# Altium PCB BUCK-BOOST_PWM_Controller.PcbDoc (part 1 of 2)
Units mm, origin at the board's own origin, x right, y up, seen from the top; angles counter-clockwise.
Board outline 90.1 x 70.25 mm, 2 copper layers (Top Layer, Bottom Layer); 191 components, 99 nets, 467 pads, 92 vias.
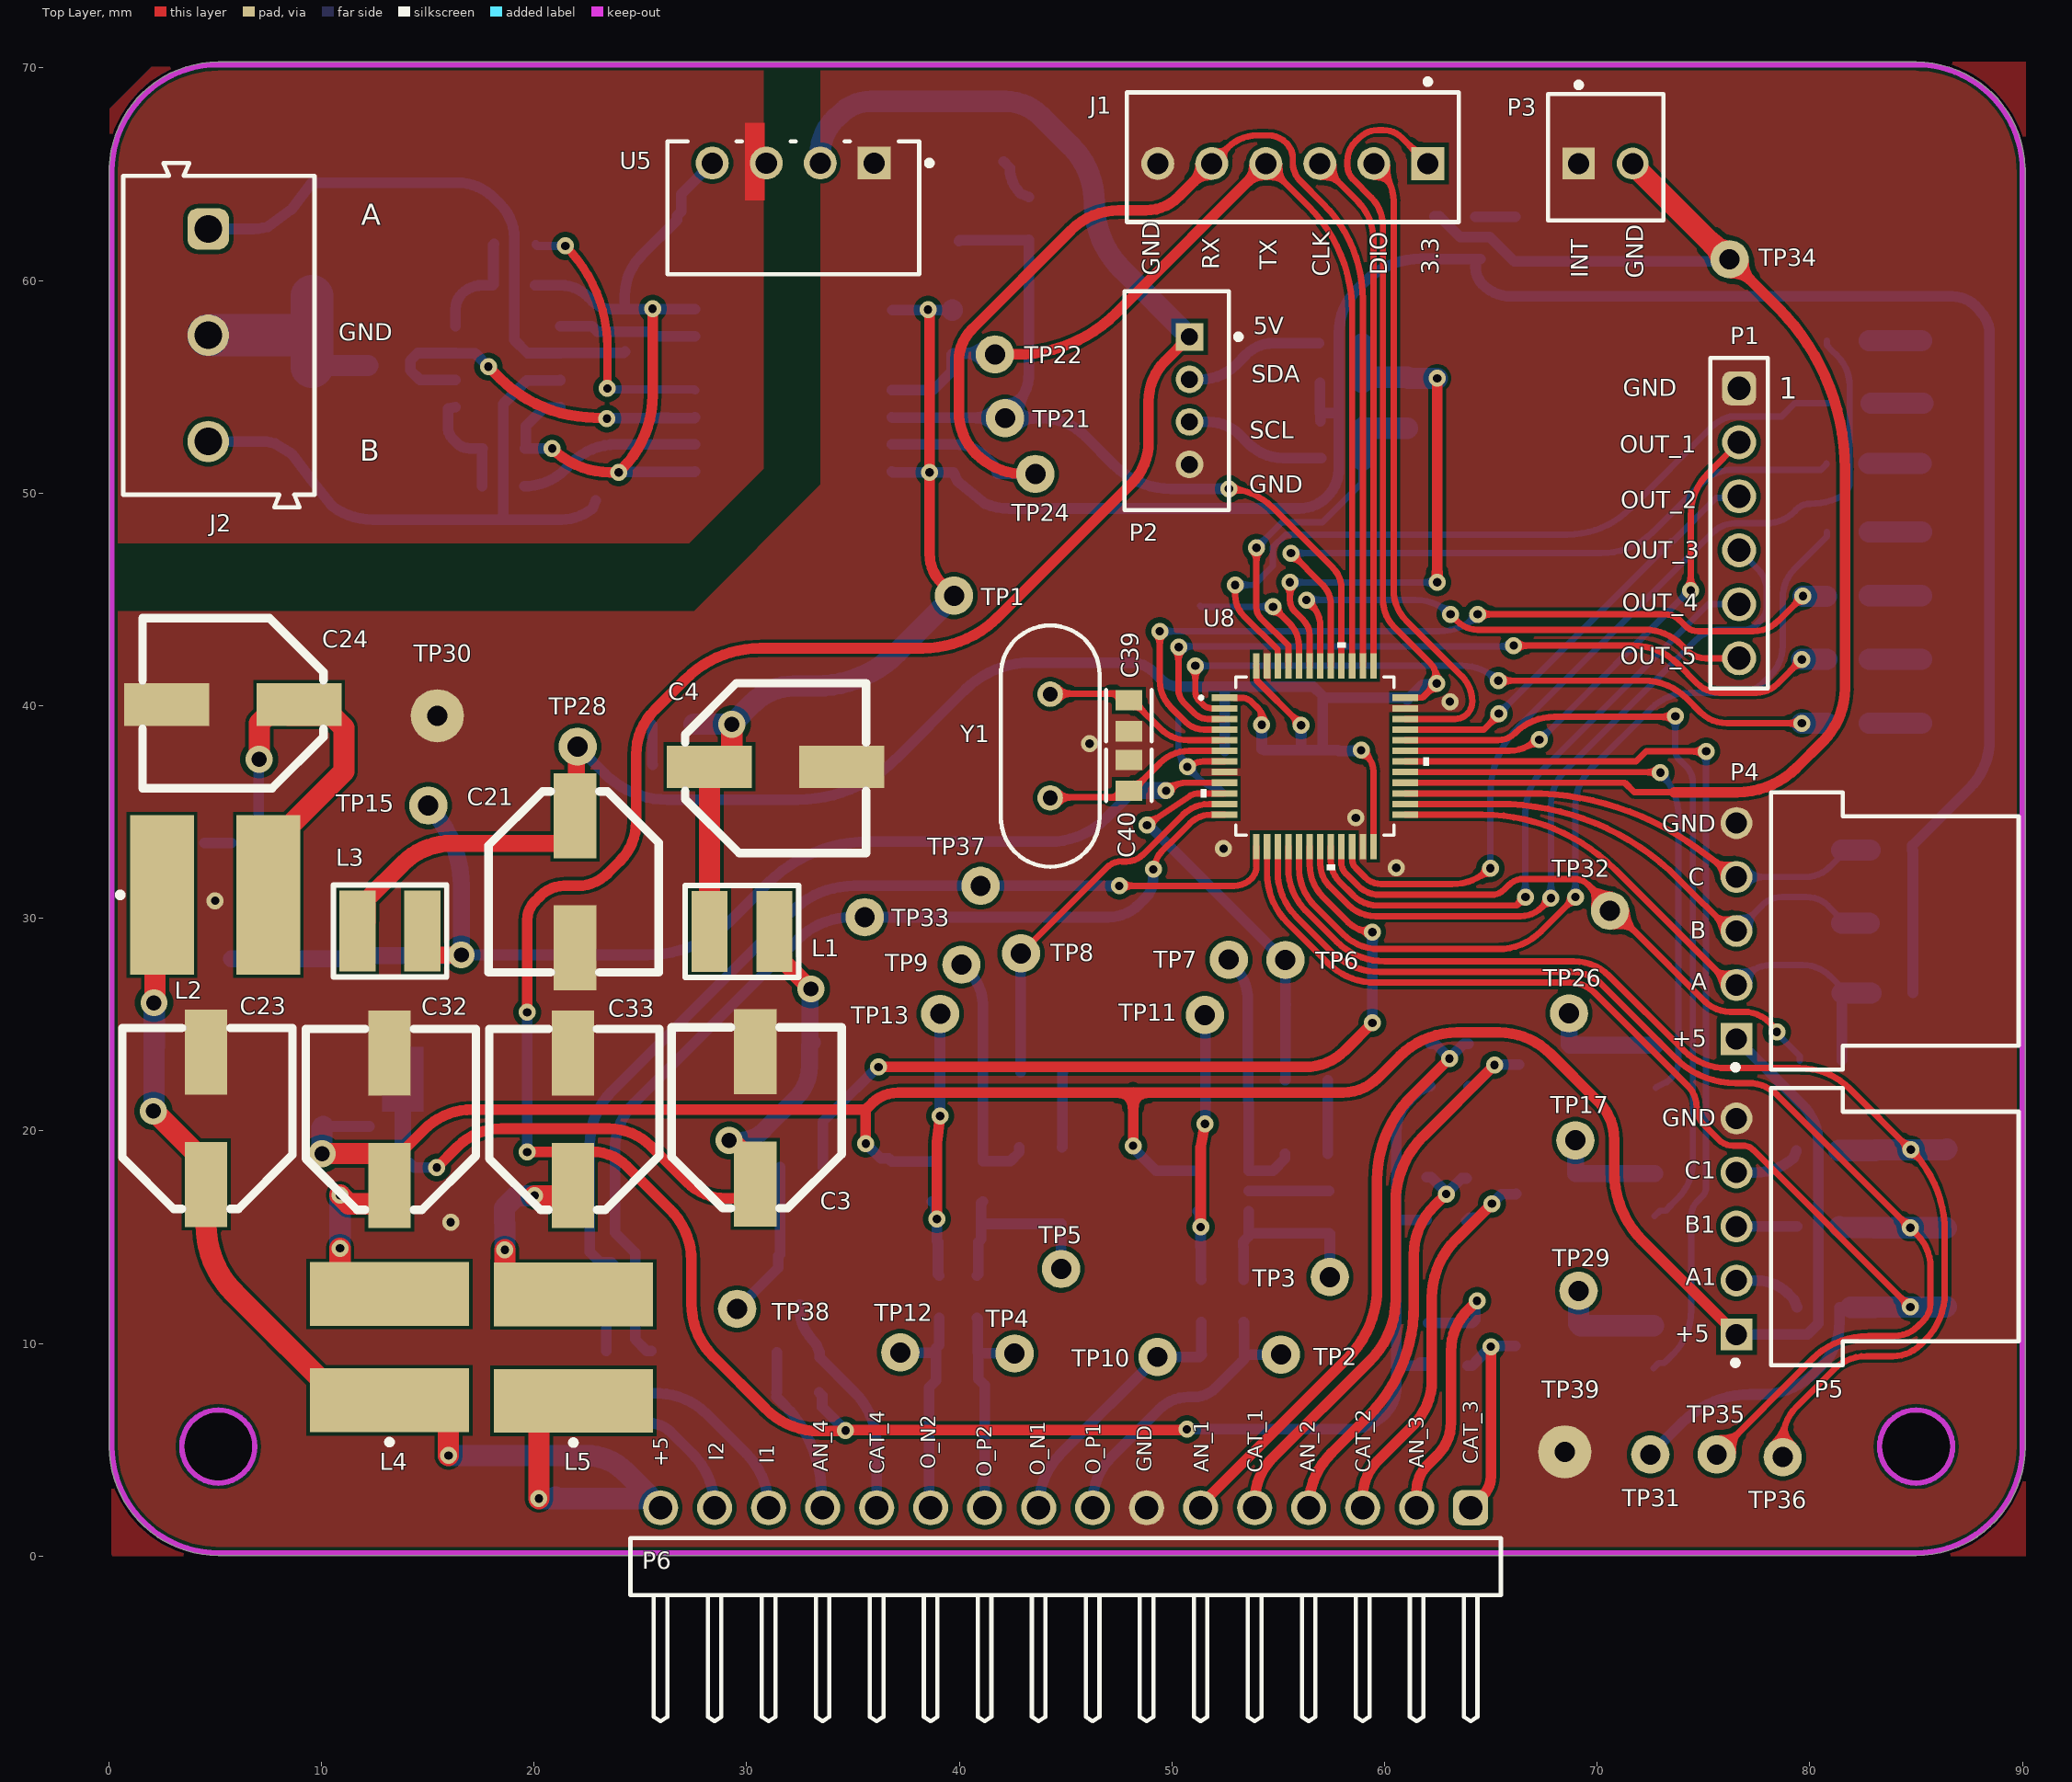
[diagram p0: Top Layer view]
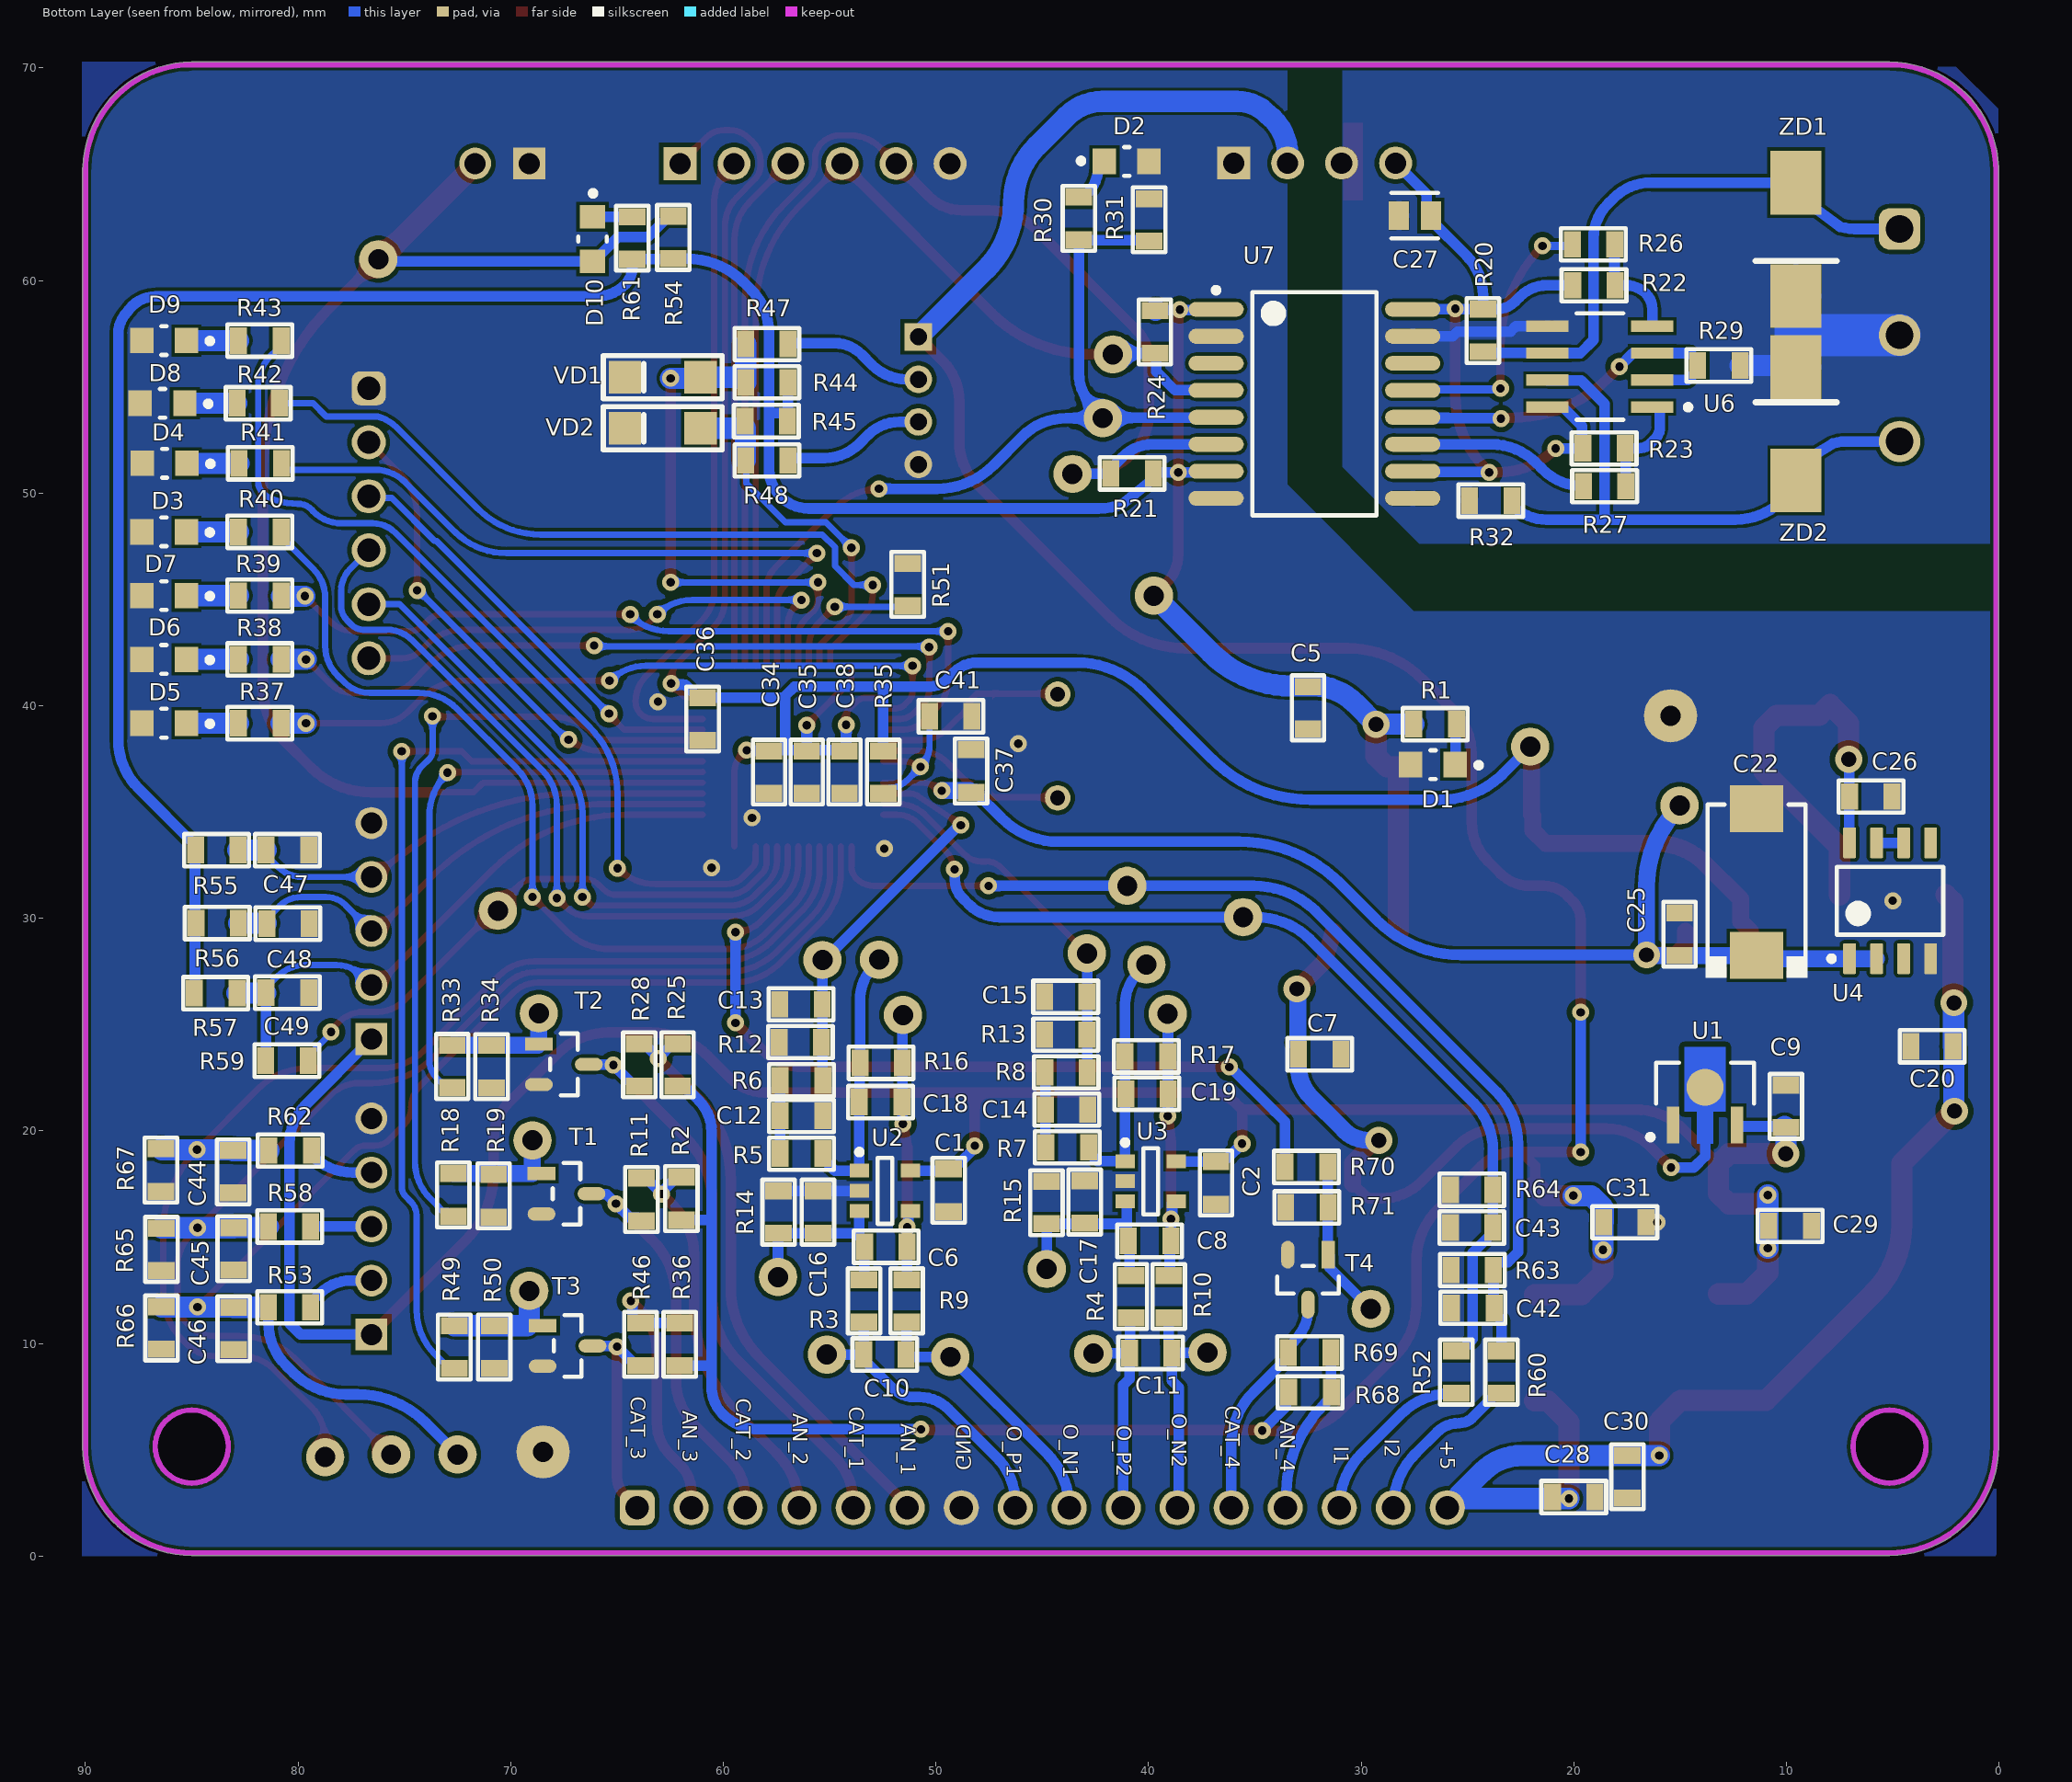
[diagram p1: Bottom Layer view, seen from below]
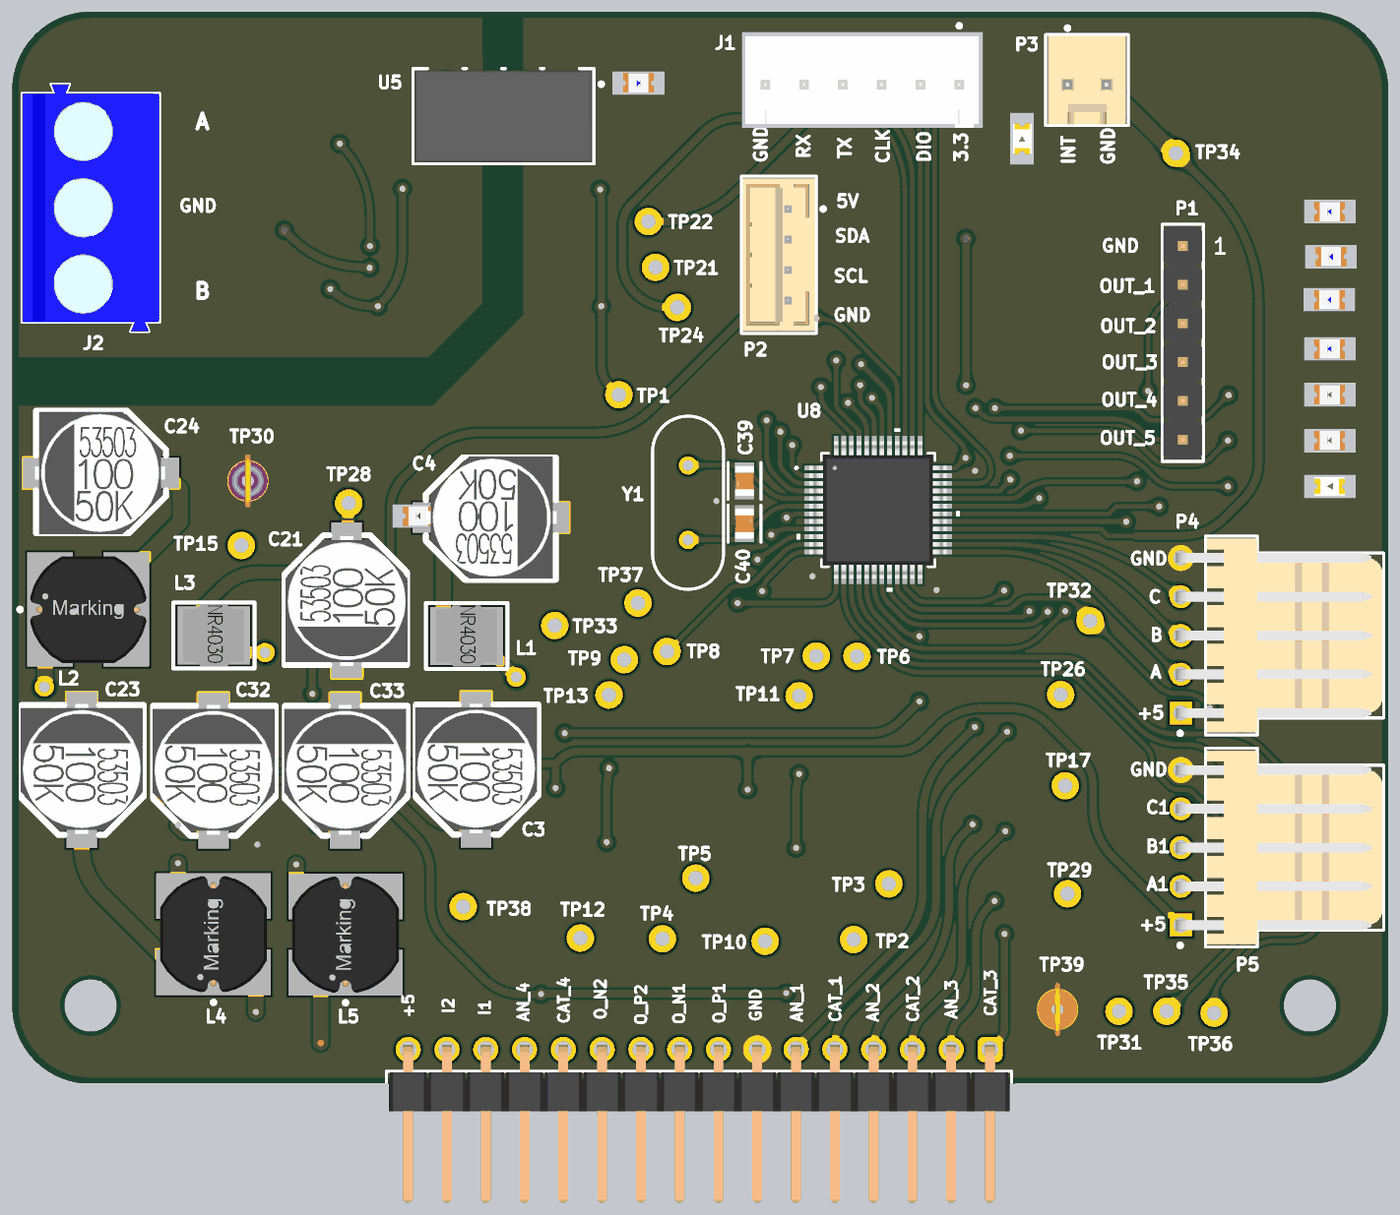
[diagram p3: 3D render of the assembled board from above, using the file's embedded part models]
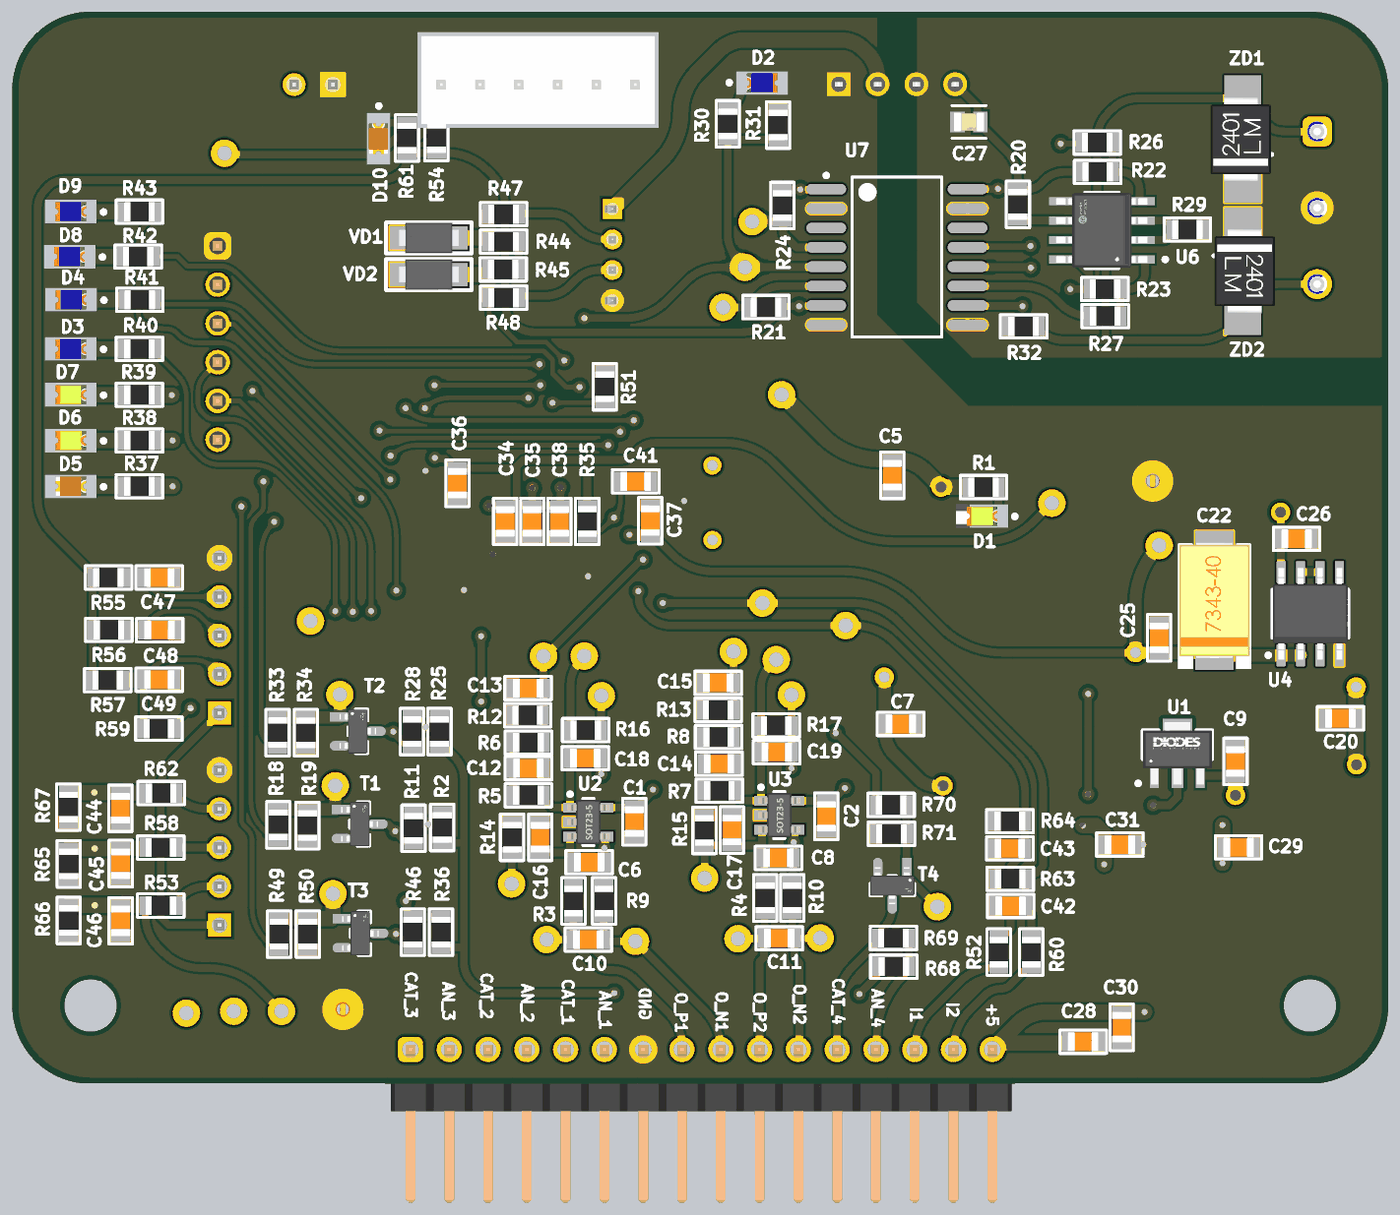
[diagram p4: 3D render of the assembled board from below, using the file's embedded part models]

## Layer stack, top to bottom
Top Solder: solder mask 0.0102, Solder Resist, Dk 3.5
Top Layer: signal copper 0.0356
Dielectric 1: dielectric 0.32, FR-4, Dk 4.8
Bottom Layer: signal copper 0.0356
Bottom Solder: solder mask 0.0102, Solder Resist, Dk 3.5

## Board outline
0.023,5.15 0.023,65.147 0.023,65.3 0.026,65.328 cw(c5.15,65.15) 5.15,70.277 85,70.277 85.001,70.277 cw(c85,65.15) 90.124,65.328 90.127,65.3 90.127,5.15 cw(c85,5.15) 85.001,0.023 85,0.023 5.15,0.023 5.148,0.023 cw(c5.15,5.15)
cut-out: 5.15,3.433 cw(c5.15,5.15) 3.433,5.15 cw(c5.15,5.15) 5.15,6.867 cw(c5.15,5.15) 6.867,5.15 cw(c5.15,5.15)
cut-out: 83.283,5.15 ccw(c85,5.15) 85,3.433 ccw(c85,5.15) 86.717,5.15 ccw(c85,5.15) 85,6.867 ccw(c85,5.15)

## Design rules (kind name [scope] priority, off if disabled: settings)
Clearance [All] p1: gap=0.15 ignorepadtopadclearanceinfootprint=FALSE except(0: Via-Hole Fill-Hole Poly-Hole Region-Hole Text-Hole; 0.2: THPad-THPad THPad-Via THPad-Fill THPad-Poly THPad-Region THPad-Text THPad-Hole; 0.254: Via-Via Via-Fill Via-Poly Via-Region Via-Text Fill-Fill Fill-Poly Fill-Region Fill-Text Poly-Poly Poly-Region Poly-Text Region-Region Region-Text Text-Text)
DiffPairsRouting [All] p1: maxlimit=0.254 minlimit=0.2 mostfreqgap=0.254 toplayer_minwidth=0.381 toplayer_maxwidth=0.381 toplayer_prefwidth=0.381 bottomlayer_minwidth=0.381 bottomlayer_maxwidth=0.381 bottomlayer_prefwidth=0.381 maxuncoupledlength=12.7
PlaneClearance [All] p1: clearance=0.635
PlaneConnect [InNet('GND_2')] p1: planeconnectstyle=Direct reliefexpansion=0.508 reliefentries=4 reliefconductorwidth=0.254 reliefairgap=0.254
PolygonConnect [InNet('GND_III') vs InNet('GND_III')] p1: connectstyle=Direct reliefconductorwidth=0.254 reliefentries=4 polygonreliefangle="90 Angle" airgapwidth=0.254
RoutingVias [All] p1: holewidth=0.4 width=0.8 viastyle="Through Hole" minholewidth=0.3 minwidth=0.6 maxholewidth=1 maxwidth=1.27
SolderMaskExpansion [All] p1: expansion=0.102 istentingtop=FALSE
Width [All] p1: maxlimit=5 minlimit=0.2 preferedwidth=0.254
27 further rules are at their usual default settings.

## Components (designator, comment, footprint, x,y, rotation, side; value= is the part's Value field where it differs from the comment)
C1 "0.1uF" CAP-0805 49.4,17.2 r90 bottom
C2 "0.1uF" CAP-0805 36.825,17.55 r90 bottom
C3 "CAP-POLAR" CAP_SMD_Size_E 30.4,20.675 r270 top locked
C4 "CAP-POLAR" CAP_SMD_Size_E 31.425,37.125 r180 top
C5 "0.1uF" CAP-0805 32.5,39.9 r90 bottom
C6 "0.1uF" CAP-0805 52.35,14.55 r0 bottom
C7 "0.1uF" CAP-0805 31.95,23.6 r0 bottom
C8 "0.1uF" CAP-0805 39.95,14.825 r0 bottom
C9 "0.1uF" CAP-0805 10.025,21.15 r270 bottom
C10 "0.1uF" CAP-0805 52.4,9.475 r0 bottom
C11 "0.1uF" CAP-0805 39.9,9.55 r0 bottom
C12 "1000pF" CAP-0805 56.325,20.7 r0 bottom
C13 "1000pF" CAP-0805 56.35,25.95 r180 bottom
C14 "1000pF" CAP-0805 43.85,21 r0 bottom
C15 "1000pF" CAP-0805 43.9,26.3 r180 bottom
C16 "0.1uF" CAP-0805 55.55,16.175 r270 bottom
C17 "0.1uF" CAP-0805 43,16.65 r270 bottom
C18 "0.1uF" CAP-0805 52.6,21.35 r0 bottom
C19 "0.1uF" CAP-0805 40.075,21.75 r0 bottom
C20 "0.1uF" CAP-0805 3.15,23.975 r180 bottom
C21 "CAP-POLAR" CAP_SMD_Size_E 21.925,31.65 r90 top
C22 "CAP-POLAR" CAP-TAN-D 11.4,31.7 r90 bottom
C23 "CAP-POLAR" CAP_SMD_Size_E 4.575,20.65 r270 top locked
C24 "CAP-POLAR" CAP_SMD_Size_E 5.775,40.05 r0 top
C25 "0.1uF" CAP-0805 15.025,29.25 r270 bottom
C26 "0.1uF" CAP-0805 6.025,35.725 r0 bottom
C27 "C0805C224K5RACTU" FP-C0805C-DN-MFG 27.475,63.05 r0 bottom value="0.22 μF"
C28 "0.1uF" CAP-0805 20,2.775 r0 bottom
C29 "0.1uF" CAP-0805 9.825,15.525 r0 bottom
C30 "0.1uF" CAP-0805 17.475,3.725 r90 bottom
C31 "0.1uF" CAP-0805 17.6,15.7 r0 bottom
C32 "CAP-POLAR" CAP_SMD_Size_E 13.2,20.6 r270 top
C33 "CAP-POLAR" CAP_SMD_Size_E 21.825,20.6 r270 top
C34 "0.1uF" CAP-0805 57.85,36.875 r90 bottom
C35 "0.1uF" CAP-0805 56.075,36.875 r90 bottom
C36 "0.1uF" CAP-0805 60.975,39.375 r90 bottom
C37 "0.1uF" CAP-0805 48.35,36.925 r270 bottom
C38 "0.1uF" CAP-0805 54.3,36.875 r90 bottom
C39 "16pF" FP-GRM21B-0_1-IPC_C 47.975,39.525 r270 top
C40 "16pF" FP-GRM21B-0_1-IPC_C 47.975,36.725 r90 top
C41 "0.1uF" CAP-0805 49.3,39.5 r0 bottom
C42 "220pF" CAP-0805 24.75,11.674 r180 bottom
C43 "220pF" CAP-0805 24.8,15.449 r180 bottom
C44 "22pF" CAP-0805 83.05,18.075 r90 bottom
C45 "22pF" CAP-0805 83.025,14.45 r90 bottom
C46 "22pF" CAP-0805 83.025,10.7 r90 bottom
C47 "330pF" CAP-0805 80.5,33.2 r0 bottom
C48 "330pF" CAP-0805 80.475,29.748 r0 bottom
C49 "330pF" CAP-0805 80.5,26.5 r0 bottom
D1 "151031YS06000" LED_GREEN 26.625,37.225 r0 bottom
D2 "LED" LED_BLUE 41.025,65.6 r180 bottom
D3 "151031YS06000" LED_BLUE 86.3,48.175 r0 bottom
D4 "151031YS06000" LED_BLUE 86.275,51.4 r0 bottom
D5 "151031YS06000" LED_RED 86.3,39.175 r0 bottom
D6 "151031YS06000" LED_YELLOW 86.3,42.175 r0 bottom
D7 "151031YS06000" LED_GREEN 86.3,45.175 r0 bottom
D8 "151031YS06000" LED_BLUE 86.375,54.225 r0 bottom
D9 "151031YS06000" LED_BLUE 86.3,57.175 r0 bottom
D10 "151031YS06000" LED_RED 66.15,61.95 r270 bottom
J1 "SWR25X-NRTC-S06-ST-BA" Sullins_SWR25X-NRTC-S06-ST-BA_MFG 55.685,65.8 r180 top
J2 "" 691101710003 5.175,57.425 r270 top
L1 "Coil" NR4030 29.775,29.375 r270 top
L2 "1000µH, 0.3A" WE-PD2_7850 5,31.1 r0 top
L3 "Coil" NR4030 13.225,29.4 r270 top
L4 "1000µH, 0.3A" WE-PD2_7850 13.2,9.825 r90 top
L5 "1000µH, 0.3A" WE-PD2_7850 21.85,9.8 r90 top
P1 "61300611121" 61300611121 76.675,48.58 r270 top
P2 "62000411622" 62000411622 50.225,54.35 r90 top
P3 "61900211121" 61900211121 70.4,65.8 r180 top
P4 "61900511021" 61900511021 84,29.4 r90 top locked
P5 "61900511021" 61900511021 84,15.5 r90 top locked
P6 "61301611021" 61301611021 45,-0.5 r0 top
R1 "220" RES-0805 26.525,39.125 r0 bottom
R2 "470" RES-0805 61.975,16.816 r270 bottom
R3 "10K" RES-0805 53.375,12 r90 bottom
R4 "10K" RES-0805 40.825,12.2 r90 bottom
R5 "10K" RES-0805 56.325,18.925 r180 bottom
R6 "10K" RES-0805 56.325,22.375 r0 bottom
R7 "10K" RES-0805 43.825,19.225 r180 bottom
R8 "10K" RES-0805 43.875,22.75 r0 bottom
R9 "10K" RES-0805 51.375,12 r90 bottom
R10 "10K" RES-0805 39.05,12.2 r90 bottom
R11 "1K" RES-0805 63.85,16.766 r90 bottom
R12 "100K*" RES-0805 56.375,24.175 r0 bottom
R13 "100K*" RES-0805 43.9,24.525 r0 bottom
R14 "10K" RES-0805 57.4,16.175 r270 bottom
R15 "10K" RES-0805 44.8,16.625 r270 bottom
R16 "10K" RES-0805 52.575,23.2 r0 bottom
R17 "10K" RES-0805 40.1,23.5 r0 bottom
R18 "1K" RES-0805 72.7,16.991 r90 bottom
R19 "10K" RES-0805 70.8,16.941 r90 bottom
R20 "10K" RES-0805 24.275,57.65 r90 bottom
R21 "10K" RES-0805 40.775,50.925 r180 bottom
R22 "10K" RES-0805 19.05,59.775 r0 bottom
R23 "10K" RES-0805 18.575,52.1 r0 bottom
R24 "10K" RES-0805 39.7,57.575 r90 bottom
R25 "470" RES-0805 62.15,23.1 r270 bottom
R26 "100" RES-0805 19.075,61.7 r0 bottom
R27 "100" RES-0805 18.55,50.325 r0 bottom
R28 "1K" RES-0805 63.95,23.1 r90 bottom
R29 "10K" RES-0805 13.175,56 r0 bottom
R30 "220" RES-0805 43.275,62.925 r270 bottom
R31 "10K" RES-0805 39.975,62.85 r270 bottom
R32 "10K" RES-0805 23.9,49.65 r180 bottom
R33 "1K" RES-0805 72.75,23.033 r90 bottom
R34 "10K" RES-0805 70.9,23.025 r90 bottom
R35 "10K" RES-0805 52.475,36.875 r90 bottom
R36 "470" RES-0805 62.05,9.958 r270 bottom
R37 "220" RES-0805 81.8,39.175 r180 bottom
R38 "220" RES-0805 81.8,42.175 r180 bottom
R39 "220" RES-0805 81.8,45.175 r180 bottom
R40 "220" RES-0805 81.8,48.175 r180 bottom
R41 "220" RES-0805 81.775,51.4 r180 bottom
R42 "220" RES-0805 81.875,54.225 r180 bottom
R43 "220" RES-0805 81.8,57.175 r180 bottom
R44 "10K" RES-0805 57.953,55.209 r180 bottom
R45 "10K" RES-0805 57.978,53.384 r180 bottom
R46 "1K" RES-0805 63.9,9.958 r90 bottom
R47 "10E" RES-0805 57.953,57.009 r180 bottom
R48 "10E" RES-0805 57.953,51.534 r180 bottom
R49 "1K" RES-0805 72.65,9.833 r90 bottom
R50 "10K" RES-0805 70.775,9.833 r90 bottom
R51 "1K" RES-0805 51.325,45.7 r270 bottom
R52 "10K" RES-0805 25.525,8.649 r90 bottom
R53 "100" RES-0805 80.4,11.7 r0 bottom
R54 "10K" RES-0805 62.35,62.025 r90 bottom
R55 "220K" RES-0805 83.825,33.2 r0 bottom
R56 "220K" RES-0805 83.8,29.775 r0 bottom
R57 "220K" RES-0805 83.875,26.475 r0 bottom
R58 "100" RES-0805 80.4,15.5 r0 bottom
R59 "20K" RES-0805 80.525,23.3 r180 bottom
R60 "10K" RES-0805 23.4,8.649 r90 bottom
R61 "220" RES-0805 64.275,62 r270 bottom
R62 "100" RES-0805 80.375,19.075 r0 bottom
R63 "22K" RES-0805 24.775,13.449 r180 bottom
R64 "22K" RES-0805 24.8,17.224 r180 bottom
R65 "220K" RES-0805 86.425,14.425 r90 bottom
R66 "220K" RES-0805 86.425,10.725 r90 bottom
R67 "220K" RES-0805 86.45,18.15 r90 bottom
R68 "470" RES-0805 32.4,7.7 r0 bottom
R69 "1K" RES-0805 32.425,9.575 r180 bottom
R70 "1K" RES-0805 32.575,18.3 r180 bottom
R71 "10K" RES-0805 32.55,16.4 r180 bottom
T1 "BC847C" SOT23-3_IPC_A 67.375,17.041 r180 bottom
T2 "BC847C" SOT23-3_IPC_A 67.5,23.125 r180 bottom
T3 "BC847C" SOT23-3_IPC_A 67.325,9.883 r180 bottom
T4 "BC847C" SOT23-3_IPC_A 32.5,13 r270 bottom
TP1 "Test_Point_PCB" Test_Point 39.75,45.175 r0 top
TP2 "Test_Point_PCB" Test_Point 55.125,9.475 r0 top
TP3 "Test_Point_PCB" Test_Point 57.425,13.125 r0 top
TP4 "Test_Point_PCB" Test_Point 42.6,9.525 r0 top
TP5 "Test_Point_PCB" Test_Point 44.787,13.5 r0 top
TP6 "Test_Point_PCB" Test_Point 55.338,28.038 r0 top
TP7 "Test_Point_PCB" Test_Point 52.675,28.05 r0 top
TP8 "Test_Point_PCB" Test_Point 42.9,28.35 r0 top
TP9 "Test_Point_PCB" Test_Point 40.1,27.817 r0 top
TP10 "Test_Point_PCB" Test_Point 49.322,9.362 r90 top
TP11 "Test_Point_PCB" Test_Point 51.55,25.45 r90 top
TP12 "Test_Point_PCB" Test_Point 37.225,9.575 r90 top
TP13 "Test_Point_PCB" Test_Point 39.1,25.5 r90 top
TP15 "Test_Point_PCB" Test_Point 15.025,35.3 r90 top
TP17 "Test_Point_PCB" Test_Point 68.975,19.55 r90 top
TP21 "Test_Point_PCB" Test_Point 42.15,53.525 r90 top
TP22 "Test_Point_PCB" Test_Point 41.675,56.525 r90 top
TP24 "Test_Point_PCB" Test_Point 43.575,50.9 r90 top
TP26 "Test_Point_PCB" Test_Point 68.675,25.525 r90 top
TP28 "Test_Point_PCB" Test_Point 22.05,38.075 r90 top
TP29 "Test_Point_PCB" Test_Point 69.125,12.475 r90 top
TP30 "Test_Point_PCB" Pin_Test_Point(Pink) 15.45,39.525 r0 top
TP31 "Test_Point_PCB" Test_Point 72.5,4.775 r90 top
TP32 "Test_Point_PCB" Test_Point 70.6,30.35 r90 top
TP33 "Test_Point_PCB" Test_Point 35.55,30.05 r90 top
TP34 "Test_Point_PCB" Test_Point 76.225,61 r90 top
TP35 "Test_Point_PCB" Test_Point 75.625,4.775 r90 top
TP36 "Test_Point_PCB" Test_Point 78.725,4.65 r90 top
TP37 "Test_Point_PCB" Test_Point 41,31.525 r90 top
TP38 "Test_Point_PCB" Test_Point 29.55,11.625 r90 top
TP39 "Test_Point_PCB" Pin_Test_Point(Orange) 68.475,4.9 r0 top
U1 "AMS1117" SOT-89 13.825,22.05 r180 bottom
U2 "" SOT-23-5 52.4,17.175 r180 bottom
U3 "" SOT-23-5 39.9,17.625 r180 bottom
U4 "LP2951ACM-3.3" D0008A_N 5.125,30.825 r90 bottom
U5 "B0505S-1W" B0505S-1W 32.19,63.425 r180 top
U6 "MAX485" SOIC-8-MFG 18.775,55.95 r0 bottom
U7 "ADUM1401BRWZ" ADI-RW-16_M 32.2,54.2 r180 bottom
U8 "STM32F303CCT6" LQFP48-7x7mm 56.725,37.625 r0 top locked
VD1 "SMF3.3A" SMF3.3A 62.85,55.45 r90 bottom
VD2 "SMF3.3A" SMF3.3A 62.85,53.05 r90 bottom
Y1 "FOXSLF/120-20" FOX-FOXSLF-2_V 44.275,38.1 r90 top
ZD1 "P6SMB16CA" DO-214AA 9.55,59.65 r90 bottom
ZD2 "P6SMB16CA" DO-214AA 9.55,55.55 r270 bottom

## Footprints (in the part's own frame and the unit in brackets; to place one, negate y for a bottom-side part, rotate by r counter-clockwise, add the part's x,y. Pads: shape width x height; smd on the part's side, far side on the other; paste and mask are expansions set on the pad)
61300611121 [mm] "Pin Header, pitch 2.54 mm, THT, Vertical, single row, 6p"
  rrect50% 1.6x1.6 hole 1.1: 1(-6.35,0)
  round 1.6 hole 1.1: 2(-3.81,0) 3(-1.27,0) 4(1.27,0) 5(3.81,0) 6(6.35,0)
  silkscreen extent -7.77,-1.35 7.77,1.35, body extent -7.62,-1.27 7.62,1.27, height 8.57
61301611021 [mm] "Pin Header, pitch 2.54 mm, THT, Angled, single row, 16p"
  rrect50% 1.65x1.65 hole 1.1: 1(19.05,2.77)
  round 1.65 hole 1.1: 2(16.51,2.77) 3(13.97,2.77) 4(11.43,2.77) 5(8.89,2.77) 6(6.35,2.77) 7(3.81,2.77) 8(1.27,2.77) 9(-1.27,2.77) 10(-3.81,2.77) 11(-6.35,2.77) 12(-8.89,2.77) 13(-11.43,2.77) 14(-13.97,2.77) 15(-16.51,2.77) 16(-19.05,2.77)
  silkscreen extent -20.47,-7.27 20.47,1.35, body extent -20.32,-7.27 20.32,3.09, height 2.58
61900211121 [mm] "2.54mm Male Locking Header, 2p"
  rect 1.5x1.5 hole 1: 1(1.27,0.3)
  round 1.5 hole 1: 2(-1.27,0.3)
  silkscreen extent -2.71,-3.52 2.71,2.98, body extent -2.54,-2.9 2.54,2.9, height 11.53
61900511021 [mm] "2.54mm Male Left Angled Header Bottom Locking, 5p"
  rect 1.5x1.5 hole 1: 1(-5.08,7.45)
  round 1.5 hole 1: 2(-2.54,7.45) 3(0,7.45) 4(2.54,7.45) 5(5.08,7.45)
  silkscreen extent -6.53,-5.82 6.52,7.62, body extent -6.35,-5.75 6.35,7.77, height 5.83
62000411622 [mm] "2.00mm Male Vertical Shrouded Header, 4p"
  rect 1.3x1.3 hole 0.8: 1(3,-0.6)
  round 1.3 hole 0.8: 2(1,-0.6) 3(-1,-0.6) 4(-3,-0.6)
  silkscreen extent -5.15,-3.03 5.15,2.45, body extent -5,-2.35 5,2.35, height 6.13
691101710003 [mm] "5,00mm - modular - blue - Horizontal entry with pressure clamp - 12,6mm height - 03p"
  rrect50% 1.95x1.95 hole 1.3: 1(-5,-0.5)
  round 1.95 hole 1.3: 2(0,-0.5) 3(5,-0.5)
  silkscreen extent -8.1,-4.5 8.1,4.5, body extent -8.1,-4.5 8.1,4.5, height 12.65
ADI-RW-16_M [mm] "SOIC, 16-Leads, Body 10.3x7.5mm, Pitch 1.27mm, IPC Low Density"
  oval 2.6x0.7 smd: 1(-4.625,4.445) 2(-4.625,3.175) 3(-4.625,1.905) 4(-4.625,0.635) 5(-4.625,-0.635) 6(-4.625,-1.905) 7(-4.625,-3.175) 8(-4.625,-4.445) 9(4.625,-4.445) 10(4.625,-3.175) 11(4.625,-1.905) 12(4.625,-0.635) 13(4.625,0.635) 14(4.625,1.905) 15(4.625,3.175) 16(4.625,4.445)
  silkscreen extent -4.75,-5.25 2.93,5.47, body extent -3.8,-5.25 3.8,5.25, height 2.65
B0505S-1W [mm]
  rect 1.55x1.55 hole 1 paste-2539.97 mask+0: 1(-3.81,-2.1)
  round 1.55 hole 1 paste-2539.97 mask+0: 2(-1.27,-2.1) 3(1.27,-2.1) 4(3.81,-2.1)
  silkscreen extent -6.53,-3.13 5.92,3.13, body extent -6.02,-3.22 6.02,3.22, height 0.25
CAP-0805 [mm]
  rect 0.8x1.25 smd mask+0.015: 1(-1,0) 2(1,0)
  silkscreen extent -1.52,-0.76 1.52,0.76, body extent -1,-0.62 1,0.63, height 0.8
CAP-TAN-D [mm]
  rect 2.2x2.5 smd: 1(-3.45,0) 2(3.45,0)
  silkscreen extent -4.5,-2.4 3.65,2.4, body extent -3.8,-2.3 3.8,2.3, height 4
CAP_SMD_Size_E [mm]
  rect 4x2 smd: 1(3.175,0) 2(-3.048,0)
  silkscreen extent -4.19,-3.94 4.32,4.06, body extent -4.25,-4 4.25,4, height 10.59
D0008A_N [mm] "SOIC, 8-Leads, Body 5x4mm, Pitch 1.27mm, IPC Medium Density"
  rrect17% 1.45x0.6 smd: 1(-2.725,1.905) 2(-2.725,0.635) 3(-2.725,-0.635) 4(-2.725,-1.905) 5(2.725,-1.905) 6(2.725,-0.635) 7(2.725,0.635) 8(2.725,1.905)
  silkscreen extent -2.85,-2.5 1.6,2.88, body extent -3,-2.45 3,2.45, height 1.63
DO-214AA [mm]
  rect 3x2.4 smd: 1(-0.381,0) 2(4.953,0)
  silkscreen extent 1.27,-1.91 1.27,1.9, body extent -0.53,-1.85 5.07,2.1, height 2.65
FOX-FOXSLF-2_V [mm] "THD, 2-Leads, Body 11.35x4.65mm, Pitch 4.88mm"
  round 1.2 hole 0.7: 1(-2.44,0) 2(2.44,0)
  silkscreen extent -5.68,-2.32 5.68,2.32, body extent -5.67,-2.32 5.68,2.32, height 3.6
FP-C0805C-DN-MFG [mm]
  rect 0.95x1.35 smd paste+0 mask+0: 1(-0.75,0) 2(0.75,0)
  silkscreen extent -1.1,-1.07 1.1,1.07, body extent -1,-0.63 1,0.63, height 0.88
FP-GRM21B-0_1-IPC_C [mm]
  rect 0.958x1.262 smd paste+0 mask+0: 1(-0.727,0) 2(0.727,0)
  silkscreen extent -1.21,-1.07 1.21,1.07, body extent -1,-0.63 1,0.63, height 1.35
LED_BLUE [mm]
  rect 1.1x1.2 smd paste+0 mask+0: 1(-1.05,0) 2(1.05,0)
  silkscreen extent -2.28,-0.67 0.13,0.67, body extent -1,-0.63 1,0.63, height 0.8
LED_GREEN [mm]
  rect 1.1x1.2 smd paste+0 mask+0: 1(-1.05,0) 2(1.05,0)
  silkscreen extent -2.27,-0.67 0.13,0.67, body extent -1,-0.63 1,0.63, height 0.8
LED_RED [mm]
  rect 1.1x1.2 smd paste+0 mask+0: 1(-1.05,0) 2(1.05,0)
  silkscreen extent -2.27,-0.67 0.13,0.67, body extent -1,-0.63 1,0.63, height 0.8
LED_YELLOW [mm]
  rect 1.1x1.2 smd paste+0 mask+0: 1(-1.05,0) 2(1.05,0)
  silkscreen extent -2.27,-0.67 0.13,0.67, body extent -1,-0.63 1,0.63, height 0.8
LQFP48-7x7mm [mm]
  rect 1.194x0.305 smd paste+0 mask+0: 1(-4.25,2.75) 2(-4.25,2.25) 3(-4.25,1.75) 4(-4.25,1.25) 5(-4.25,0.75) 6(-4.25,0.25) 7(-4.25,-0.25) 8(-4.25,-0.75) 9(-4.25,-1.25) 10(-4.25,-1.75) 11(-4.25,-2.25) 12(-4.25,-2.75) 25(4.25,-2.75) 26(4.25,-2.25) 27(4.25,-1.75) 28(4.25,-1.25) 29(4.25,-0.75) 30(4.25,-0.25) 31(4.25,0.25) 32(4.25,0.75) 33(4.25,1.25) 34(4.25,1.75) 35(4.25,2.25) 36(4.25,2.75)
  rect 0.305x1.194 smd paste+0 mask+0: 13(-2.75,-4.25) 14(-2.25,-4.25) 15(-1.75,-4.25) 16(-1.25,-4.25) 17(-0.75,-4.25) 18(-0.25,-4.25) 19(0.25,-4.25) 20(0.75,-4.25) 21(1.25,-4.25) 22(1.75,-4.25) 23(2.25,-4.25) 24(2.75,-4.25) 37(2.75,4.25) 38(2.25,4.25) 39(1.75,4.25) 40(1.25,4.25) 41(0.75,4.25) 42(0.25,4.25) 43(-0.25,4.25) 44(-0.75,4.25) 45(-1.25,4.25) 46(-1.75,4.25) 47(-2.25,4.25) 48(-2.75,4.25)
  silkscreen extent -5.43,-5.35 5.35,5.35, body extent -4.5,-4.5 4.5,4.5, height 1.6
NR4030 [mm]
  rect 3.8x1.7 smd: 1(0,1.524) 2(0,-1.524)
  silkscreen extent -2.16,-2.67 2.16,2.67, body extent -2,-2 2,2, height 3.15
Pin_Test_Point(Orange) [mm]
  round 2.5 hole 0.95: 1(0,0)
  body extent -1.3,-1.78 1.3,1.78, height 6.93
Pin_Test_Point(Pink) [mm]
  round 2.5 hole 0.95: 1(0,0)
  body extent -1.3,-1.78 1.3,1.78, height 6.93
RES-0805 [mm]
  rect 0.8x1.25 smd mask+0.015: 1(-1,0) 2(1,0)
  silkscreen extent -1.52,-0.76 1.52,0.76, body extent -1,-0.62 1,0.63, height 0.6
SMF3.3A [mil]
  rect 60x60 smd: 1(0,70) 2(0,-70)
  silkscreen extent -40,-110 40,110, body extent -39,-77 39,77, height 48
SOIC-8-MFG [mm]
  rect 1.98x0.53 smd paste+0 mask+0: 1(-2.465,1.905) 2(-2.465,0.635) 3(-2.465,-0.635) 4(-2.465,-1.905) 5(2.465,-1.905) 6(2.465,-0.635) 7(2.465,0.635) 8(2.465,1.905)
  silkscreen extent -4.27,-2.5 1.1,2.5, body extent -3,-2.45 3,2.45, height 1.75
SOT23-3_IPC_A [mm]
  rect 1.308x0.616 smd paste+0 mask+0: 1(-1.175,0.95)
  rrect100% 1.308x0.616 smd paste+0 mask+0: 2(-1.175,-0.95) 3(1.175,0)
  silkscreen extent -0.65,-1.45 0.65,1.45, body extent -1.2,-1.45 1.2,1.45, height 1.1
SOT-23-5 [mm]
  rect 0.9x0.65 smd: 1(-1.2,0.95) 2(-1.2,0) 3(-1.2,-0.95) 4(1.2,-0.95) 5(1.2,0.95)
  silkscreen extent -1.33,-1.55 0.35,1.95, body extent -1.4,-1.45 1.4,1.45, height 1.24
SOT-89 [mm]
  rect 0.58x1.73 smd paste+0 mask+0: 1(-1.5,-1.781) 3(1.5,-1.781)
  round 1.74 smd paste+0 mask+0: 2(0,0)
  Top Layer region: -0.38,-2.646 -0.38,-1.146 -0.967,-1.146 -0.967,1.884 0.967,1.884 0.967,-1.146 0.38,-1.146 0.38,-2.646
  silkscreen extent -2.7,-2.47 2.3,1.15, body extent -2.25,-2.42 2.25,1.68, height 1.6
Sullins_SWR25X-NRTC-S06-ST-BA_MFG [mm]
  rect 1.55x1.55 hole 1 paste-2539.97 mask+0: 1(-6.35,0.3)
  round 1.55 hole 1 paste-2539.97 mask+0: 2(-3.81,0.3) 3(-1.27,0.3) 4(1.27,0.3) 5(3.81,0.3) 6(6.35,0.3)
  silkscreen extent -7.8,-3.67 7.8,3.05, body extent -7.9,-3.15 7.9,3.15, height 0.25
Test_Point [mm]
  round 1.8 hole 0.95: 1(0,0)
WE-PD2_7850 [mm] "SMD Power Inductor, 2-Leads, body 7.8x7mm"
  rect 3x7.5 smd: 1(-2.5,0) 2(2.5,0)
  silkscreen extent -4.59,-0.12 -4.34,0.12, body extent -3.81,-3.5 3.81,3.5, height 4.95

## Part data
C1 C2 C5 C6 C7 C8 C9 C10 C11 C12 C13 C14 C15 C16 C17 C18 C19 C20 C25 C26 C28 C29 C30 C31 C34 C35 C36 C37 C38 C41 C42 C43 C44 C45 C46 C47 C48 C49: library part CAP-NON-POLAR
C27: library part CMP-1036-04552-2, "CAP CER 0.22UF 50V X7R 0805", Capacitance="0.22 μF", Manufacturer=KEMET, Package=C0805C-DN, Temperature="-55°C to +125°C", Temperature Characteristic=X7R, Temperature Coefficient=30ppm/°C, Temperature Range High=+125°C, Temperature Range Low=-55°C, Tolerance=0.1, Voltage Rating="50 V", Automotive=No, Category=Cap, ComponentLink2Description=Datasheet, ComponentLink2URL=https://content.kemet.com/datasheets/KEM_C1003_C0G_SMD.pdf, Device Class L1="Passive Components", Device Class L2=Capacitors, Device Class L3="Ceramic Capacitors", Digikey Description="CAP CER 0.22UF 50V X7R 0805", Height=0.88mm, Ipc Land Pattern Name=CAPC200125X78, Lead Free=Yes, Manufacturer Part Number=C0805C224K5RACTU, Material=Ceramic, Mouser Description="CAP CER 0.22UF 50V X7R 0805", Octopart=https://octopart.com/c0805c224k5ractu-kemet-144670, RoHS=TRUE
C39 C40: library part CMP-2007-03453-2, "Chip Multilayer Ceramic Capacitors for General Purpose, 0805, 16pF, X5R, 15%, 10%, 16V", Capacitance=10uF, Case Code (Imperial)=0805, Case Code (Metric)=2012, Dielectric=X5R, Max Operating Temperature=85°C, Min Operating Temperature=-55°C, Package Quantity=1, Tolerance=10%, Voltage=16V, Case/Package=0805, Depth=1.25mm, Height=1.25mm, Lead Free="Lead Free", Length=2mm, Material=Ceramic, Mount="Surface Mount", Packaging="Tape and Reel", Radiation Hardening=No, REACH SVHC="No SVHC", Termination=SMD/SMT, Thickness=0.053inch, Voltage Rating=16V, Voltage Rating (DC)=16V, Width=1.25mm
D1 D3 D4 D5 D6 D7 D8 D9 D10: library part LED, "WURTH ELEKTRONIK - 151031YS06000 - LED, Yellow, Through Hole, T-1 (3mm), 30 mA, 2 V, 590 nm", Manufacturer_Name="Wurth Elektronik", Mouser Part Number=710-151031YS06000, Datasheet Link=https://katalog.we-online.de/led/datasheet/151031YS06000.pdf, Geometry.Height=5.5mm, Manufacturer_Part_Number=151031YS06000, Mouser Price/Stock=https://www.mouser.co.uk/ProductDetail/Wurth-Elektronik/151031YS06000?qs=LlUlMxKIyB3xSYYW%252BcuBiQ%3D%3D
D2: "WURTH ELEKTRONIK - 151031YS06000 - LED, Yellow, Through Hole, T-1 (3mm), 30 mA, 2 V, 590 nm", Manufacturer_Name="Wurth Elektronik", Manufacturer_Part_Number=151031YS06000, Mouser Part Number=710-151031YS06000, Datasheet Link=https://katalog.we-online.de/led/datasheet/151031YS06000.pdf, Geometry.Height=5.5mm, Mouser Price/Stock=https://www.mouser.co.uk/ProductDetail/Wurth-Elektronik/151031YS06000?qs=LlUlMxKIyB3xSYYW%252BcuBiQ%3D%3D
J2: library part 691101710003, "WR-TBL Series 101 Horizontal Entry Modular, Through Hole, pitch 5mm, 3p", Manufacturer="Wurth Elektronik", Operating Temperature Max=105°C, Operating Temperature Min=-40°C, Rated Current=16A, Working Voltage=250V, Application="Pressure Clamp", Category="Terminal Blocks", ComponentLink1Description="Manufacturer Link", ComponentLink1URL=https://www.we-online.com/redexpert/article/691101710003?ad, ComponentLink2Description=Datasheet, ComponentLink2URL=https://www.we-online.com/redexpert/spec/691101710003?ad, Manufacturer Part Number=691101710003, Match Code=WR-TBL, Modularity=Yes, Mount="Through Hole", Orientation=Horizontal, Packaging=Box, PCB/Cable/Panel=PCB, Pin Number=3, Pitch=5mm
L2 L4 L5: library part 74477530, "WE-PD2 SMT Power Inductor, size 7850, 1000µH, 0.3A, 3.3Ω", Case/Size Code=7850, DC Resistance=2.78Ω, DC Resistance Max=3.3Ω, Inductance=1000µH, Manufacturer="Wurth Elektronik", Operating Temperature Max=125°C, Operating Temperature Min=-40°C, Rated Current=0.3A, Self Resonant Frequency=2.4MHz, Category="Unshielded Power Inductors", ComponentLink1Description="Website Link", ComponentLink1URL=https://www.we-online.com/redexpert/article/74477530?ad, ComponentLink2Description="Datasheet Link", ComponentLink2URL=https://www.we-online.com/redexpert/spec/74477530?ad, Height=4.95mm, Length=7.8mm, Manufacturer Part Number=74477530, Match Code=WE-PD2, Mount="Surface Mount", Packaging="Tape and Reel", Saturation Current=0.3A, Width=7mm, Simulation ModelName=7850_74477530_1m, Simulation ModelText=".subckt 7850_74477530_1m 1 2 / Rp 1 2 187304.915771 / Cp 1 2 4.36976277949p / Rs 1 N3 3.3 / L1 N3 2 1000u / .ends 7850_74477530_1m", Simulation PortMap=(1:1),(2:2)
P1: "WR-PHD Pin Header, THT, Vertical, pitch 2.54mm, 1 Row, 6P", Contact Resistance=20mΩ, Manufacturer="Wurth Elektronik", Operating Temperature Max=105°C, Operating Temperature Min=-40°C, Rated Current=3A, Withstanding Voltage=500V, Working Voltage=250V, Category="Board-to-Board Connectors", ComponentLink1Description="Website Link", ComponentLink1URL=https://www.we-online.com/redexpert/article/61300611121?ad, ComponentLink2Description="Datasheet Link", ComponentLink2URL=https://www.we-online.com/redexpert/spec/61300611121?ad, Gender="Pin Header", Manufacturer Part Number=61300611121, Match Code=WR-PHD, Mount="Through Hole", Number of Pins=6, Number of Rows=1, Orientation=Vertical, Packaging=Bag, Pitch=2.54mm
P2: "WR-WTB Male Vertical Shrouded Header, pitch 2mm, 4p", Contact Resistance=20mOhm, Operating Temperature="-25 to +85degC", Rated Current=2A, Withstanding Voltage=800VAC, Working Voltage=125VAC, ComponentLink1Description=Manufacturer, ComponentLink1URL=http://www.we-online.de, ComponentLink2Description=Datasheet, ComponentLink2URL=https://www.we-online.com/catalog/datasheet/62000411622.pdf, Gender=Male, Mounting Technology=THT, Packaging=Bag, Part Number=62000411622, Pin Number=4, Pitch=2mm, Published Date="January 2020", Publisher="Wurth Elektronik", Type=Vertical
P3: "WR-WTB THT Male Vertical Locking Header, pitch 2.54mm, 2p", Contact Resistance=20mOhm, Operating Temperature="-40 to +105degC", Rated Current=3A, Withstanding Voltage=1000VAC, Working Voltage=250VAC, ComponentLink1Description=Manufacturer, ComponentLink1URL=http://www.we-online.de, ComponentLink2Description=Datasheet, ComponentLink2URL=https://www.we-online.com/catalog/datasheet/61900211121.pdf, Gender=Male, Mounting Technology=THT, Packaging=Bag, Part Number=61900211121, Pin Number=2, Pitch=2.54mm, Published Date="January 2020", Publisher="Wurth Elektronik", Type=Vertical
P4 P5: "WR-WTB THT Male Left Angled Bottom Locking Header, pitch 2.54mm, 5p", Contact Resistance=20mOhm, Operating Temperature="-40 to +105degC", Rated Current=3A, Withstanding Voltage=1000VAC, Working Voltage=250VAC, ComponentLink1Description=Manufacturer, ComponentLink1URL=http://www.we-online.de, ComponentLink2Description=Datasheet, ComponentLink2URL=https://www.we-online.com/catalog/datasheet/61900511021.pdf, Gender=Male, Mounting Technology=THT, Packaging=Bag, Part Number=61900511021, Pin Number=5, Pitch=2.54mm, Published Date="January 2020", Publisher="Wurth Elektronik", Type="Right Angled Bottom Locking"
P6: "WR-PHD Pin Header, THT, Angled, pitch 2.54mm, 1 Row, 16P", Contact Resistance=20mΩ, Manufacturer="Wurth Elektronik", Operating Temperature Max=105°C, Operating Temperature Min=-40°C, Rated Current=3A, Withstanding Voltage=500V, Working Voltage=250V, Category="Board-to-Board Connectors", ComponentLink1Description="Website Link", ComponentLink1URL=https://www.we-online.com/redexpert/article/61301611021?ad, ComponentLink2Description="Datasheet Link", ComponentLink2URL=https://www.we-online.com/redexpert/spec/61301611021?ad, Gender="Pin Header", Manufacturer Part Number=61301611021, Match Code=WR-PHD, Mount="Through Hole", Number of Pins=16, Number of Rows=1, Orientation=Angled, Packaging=Bag, Pitch=2.54mm
R1 R2 R3 R4 R5 R6 R7 R8 R9 R10 R11 R12 R13 R14 R15 R16 R17 R18 R19 R20 R21 R22 R23 R24 R25 R26 R27 R28 R29 R30 R31 R32 R33 R34 R35 R36 R37 R38 R39 R40 R41 R42 R43 R44 R45 R46 R47 R48 R49 R50 R51 R52 R53 R54 R55 R56 R57 R58 R59 R60 R61 R62 R63 R64 R65 R66 R67 R68 R69 R70 R71: library part RES-CONST
TP1 TP2 TP3 TP4 TP5 TP6 TP7 TP8 TP9 TP10 TP11 TP12 TP13 TP15 TP17 TP21 TP22 TP24 TP26 TP28 TP29 TP30 TP31 TP32 TP33 TP34 TP35 TP36 TP37 TP38 TP39: library part TP_PCB?, "Test_Point"
U2 U3: library part MCP6001T, "IC OPAMP GP 1 CIRCUIT SOT23-5", Case/Package=SOT-23, Input Bias Current=1pA, Input Offset Voltage (Vos)=4.5mV, Max Operating Temperature=85°C, Max Supply Voltage=6V, Min Operating Temperature=-40°C, Min Supply Voltage=1.8V, Nominal Supply Current=100uA, Operating Supply Voltage=5.5V, Output Current=23mA, Package Quantity=1, Power Supply Rejection Ratio (PSRR)=86dB, Voltage Gain=112dB, Bandwidth=1MHz, Common Mode Rejection Ratio=60dB, Contact Plating=Tin, Gain Bandwidth Product=1MHz, Height=1.3mm, Lead Free="Lead Free", Length=3.1mm, Mount="Surface Mount", Number of Amplifiers=1, Number of Channels=1, Number of Circuits=1, Number of Elements=1, Number of Pins=5, Operating Supply Current=100uA, Output Current per Channel=23mA, Packaging="Tape and Reel", Radiation Hardening=No, REACH SVHC="No SVHC", Slew Rate=0.6V/µs, Unity Gain Bandwidth Product=1MHz, Voltage=6V, Width=1.8mm
U4: library part CMP-0062-01032-3, "Series of Adjustable Micropower Voltage Regulators, 8-pin Narrow SOIC", Manufacturer="Texas Instruments", PackageTopMarking=NSZXTT*2951A*CM33DD, PowerWise=N, Code_IPC=SOIC127P600-8, Code_JEDEC=MS-012-AA, ComponentLink1Description="Datasheet URL", ComponentLink1URL=http://www.ti.com/general/docs/lit/getliterature.tsp?genericPartNumber=LP2951-N&fileType=pdf, CompType="LDO IC", PackageDescription="SOIC Narrow, 4.9 x 3.9 x 1.45mm, 8 Lead, 1.27mm Pitch", PackageReference=D0008A, PinCount=8, RoHS=N
U7: library part CMP-0534-00565-1, "Quad Channel Digital Isolator, 2.5 KV rms Insulation Rating, 10 Mbps Data Rate, 50 ns Delay, Industrial, 16-pin SOIC (RW-16), Tube", Manufacturer="Analog Devices", Max Operating Temp (degreesC)=125, Code_JEDEC=MS-013-AA, ComponentLink1Description="Manufacturer URL", ComponentLink1URL=http://www.analog.com/en/index.html, ComponentLink2Description=Datasheet, ComponentLink2URL=http://www.analog.com/static/imported-files/data_sheets/ADuM1400_1401_1402.pdf, ComponentLink3Description="Package Specification", ComponentLink3URL=http://www.analog.com/static/imported-files/packages/PKG_PDF/SOIC_WIDE%20%28RW%29/RW_16.pdf, ComponentLink4Description="URL Link1", ComponentLink4URL="Product URL:http://www.analog.com/en/interface-isolation/digital-isolators/adum1401/products/product.html", ComponentLink5Description="URL Link2", ComponentLink5URL="Reference Circuit:http://www.analog.com/en/interface-isolation/digital-isolators/adum1401/products/product.html#product-recommendations", DatasheetVersion="Rev. H", Max Data Rate=10Mbps, Mounting Technology="Surface Mount", PackageDescription="16-Pin Standard Small Outline Package, Body 10.3 x 7.5 mm, Pitch 1.27 mm", PackageReference=RW-16, PackageVersion="032707-B, 03/2007", PartNumber=ADUM1401BRWZ
U8: "No Description Available", Mfr_Name=STMicroelectronics, RefDes=RefDes, Type=Type
VD1 VD2: library part ESD_Unidirect
Y1: library part CMP-1749-00004-1, "Resistance Weld Thru-Hole Crystal, 12 MHz, +/-30 ppm, -20 to 70 degC, 2-Pin THD, RoHS, Bulk", Case\Package=TO-251-3, Input Capacitance="350 pF", Max Operating Temperature="150 degC", Max Power Dissipation="2.5 W", Min Operating Temperature="-55 degC", Package Quantity=70, ComponentLink1Description="Manufacturer URL", ComponentLink1URL=http://www.foxonline.com/, ComponentLink2Description=Datasheet, ComponentLink2URL=http://www.foxonline.com/pdfs/hc49slf.pdf, DatasheetVersion=Mar-15, Elements=1, Height="6.1 mm", Length="6.6 mm", Mount="Through Hole", PackageDescription="2-Pin Through Hole Device, Body 11.35 x 4.65 mm, Pitch 4.88 mm", PackageReference=FOXSLF-2, Packaging=Rail/Tube, Pins=3, Radiation Hardening=No, Rds On Max="115 mohm", REACH SVHC="No SVHC", RoHSCompliant=true, Typical Rise Time="90 ns", Width="2.3 mm"

## Via types
v1: diameter 0.8/0.8 (per signal layer), hole 0.4, Top Layer to Bottom Layer, tented both sides, 84 vias
v2: diameter 1.27, hole 0.711, Top Layer to Bottom Layer, 8 vias

## Nets (pads, with @x,y where several pads share a name; then routed paths per layer and width w, separated by ;. In a path a pad name is that pad's centre, name@x,y a point inside that pad or via, vN(x,y) a via of type N, cw(c..) or ccw(c..) an arc to the next point about the centre after c; other vN are vias at no path point)
+3V3: C4.1 C5.2 L1.2 R1.2 R21.2 R24.2 R44.2 R45.2 R54.1 R55.2 R56.2 R57.2 R61.2 TP1.1 U7.1 U7.7 | length 142
  Top Layer w0.5: L1.2@28.2,29.426 L1.2@28.251,29.375 ; v1(38.525,58.625) 38.6,58.55 v1(38.6,50.975) 38.6,47.147 38.6,47.145 ccw(c40.58,47.145) 39.179,45.746 TP1.1@39.75,45.175
  Top Layer w1: C4.1@28.25,37.125 28.8,37.125 29.3,37.625 v2(29.3,39.125) ; L1.2@28.251,29.375 C4.1@28.251,37.101
  Bottom Layer w0.5: U7.7@36.825,51.025 36.875,50.975 v1(38.6,50.975) 39.725,50.975 39.925,50.55 41.195,49.505 ccw(c42.351,52.295) 42.351,49.275 42.353,49.275 55.969,49.275 55.971,49.275 ccw(c55.971,51.156) 57.302,49.827 ccw(c55.981,51.149) 57.85,51.149 57.85,53.759 57.85,57.521 57.85,57.522 cw(c60.753,57.522) 58.702,59.577 59.043,59.918 cw(c61.713,57.251) 61.713,61.025 61.975,61.025 R54.1@62.35,61.025 62.363,61.012 64.1,61.012 R61.2@64.487,61.012 ; U7.1@36.86,58.61 v1@38.54,58.61 ; v1(38.525,58.625) v1@38.54,58.61 ; R24.2@39.665,58.61 v1@38.54,58.61 ; R24.2@39.7,58.575 39.675,58.6 38.55,58.6 v1@38.54,58.61 ; R45.2@56.966,53.753 R44.2@56.966,55.197 ; R45.2@56.978,53.384 56.978,53.753 57.122,53.753 57.128,53.759 57.718,53.759 57.85,53.891 ; R61.2@64.5,61 R61.2@64.275,61 64.282,60.85 64.282,60.615 ccw(c65.424,60.616) 64.615,59.81 ccw(c65.965,61.157) 65.965,59.25 65.967,59.25 86.692,59.25 cw(c86.692,57.658) 87.954,58.628 88.049,58.504 cw(c86.971,57.483) 88.456,57.483 88.456,38.4 cw(c85.212,38.4) 87.505,36.105 84.825,33.425 R55.2@84.825,33.2 ; R57.2@84.85,26.5 R55.2@84.85,33.175
  Bottom Layer w1: R1.2@27.525,39.125 v2(29.3,39.125) 30.304,40.129 cw(c32.226,38.206) 32.226,40.925 32.5,40.925 33.28,40.925 ccw(c33.277,46.291) 37.072,42.497 TP1.1@39.75,45.175 ; R24.2@39.665,58.61 R24.2@39.675,58.6
+3V3_MCU: C21.1 C34.2 C35.2 C36.2 C38.2 J1.1 L3.2 R35.2 TP28.1 U8.1 U8.24 U8.36 U8.48 | length 117.2
  Top Layer w0.3: U8.1@52.475,40.375 52.922,40.373 53.264,40.373 cw(c53.264,39.677) 53.756,40.169 54.069,39.856 cw(c53.695,39.482) 54.224,39.482 v1(54.225,39.1) v1(54.225,39.1) ; U8.48@53.975,41.875 53.977,41.873 53.977,41.198 v1@56.004,39.171 ; 58.25,65.622 58.25,65.408 58.25,65.406 ccw(c59.17,65.406) 58.521,64.754 59.357,63.918 59.358,63.917 ; 58.25,65.623 cw(c59.522,65.623) 58.623,66.523 58.808,66.708 cw(c59.693,65.824) 59.693,67.075 59.942,67.075 cw(c59.942,65.825) 60.826,66.709 60.827,66.708 J1.1@62.035,65.5 ; v1@58.9,37.923 59.161,37.662 cw(c58.404,36.904) 59.475,36.904 ; 59.358,63.917 cw(c57.989,62.548) 59.925,62.548 59.925,44.986 ccw(c61.759,44.985) 60.462,43.688 62.132,42.018 62.134,42.016 cw(c61.37,41.253) 62.45,41.253 v1(62.45,41.041) 61.784,40.375 U8.36@60.975,40.375 ; U8.24@59.475,33.375 59.475,36.903
  Top Layer w0.8: L3.2@11.701,29.4 12.151,29.85 12.151,30.901 13.814,32.564 cw(c16.134,30.244) 16.136,33.525 21.325,33.525 21.925,34.125 C21.1@21.925,34.825 21.987,34.887 21.987,38.012 TP28.1@22.05,38.075
  Bottom Layer w0.3: C38.2@54.225,37.95 C38.2@54.3,37.875 C38.2@54.338,37.912
  Bottom Layer w0.5: TP28.1@22.05,38.075 23.326,36.799 23.328,36.797 ccw(c26.277,39.746) 26.277,35.575 26.279,35.575 32.39,35.575 32.392,35.575 ccw(c32.392,42.113) 37.016,37.491 40.258,40.733 cw(c43.375,37.618) 43.375,42.025 48.032,42.025 cw(c48.032,40.412) 49.172,41.553 49.174,41.551 49.516,41.209 ccw(c50.262,41.955) 50.262,40.9 52.475,40.9 56.65,40.9 57.1,40.45 57.1,40.225 ; R35.2@52.475,37.875 52.475,40.9 ; C38.2@54.225,37.95 v1(54.225,39.1) ; C38.2@54.338,37.912 57.1,37.912 ; C35.2@56.075,38.075 v1(56.075,39.075) ; C34.2@57.813,37.912 57.1,37.912 ; C34.2@57.85,37.875 v1@58.9,37.875 ; C36.2@60.975,40.375 57.25,40.375 57.1,40.225 ; C36.2@61.075,40.275 61.784,40.984 62.393,40.984 v1(62.45,41.041) ; 57.1,37.912 57.1,40.225
  other v1: 58.9,37.9
+3V3_REF: C22.1 C25.2 C37.2 L3.1 TP15.1 U4.1 U4.2 U8.9 | length 59.5
  Top Layer w0.3: v1(49.725,36) 49.983,36.168 cw(c50.681,35.095) 50.681,36.375 50.687,36.375 U8.9@52.475,36.375
  Top Layer w0.8: L3.1@14.749,29.4 14.749,28.725 15.199,28.275 v2(16.575,28.275)
  Bottom Layer w0.5: v2(16.575,28.275) 25.311,28.275 ; 25.313,28.275 ccw(c25.313,33.858) 29.261,29.911 30.987,31.637 cw(c35.725,26.902) 35.725,33.6 ; 35.727,33.6 44.229,33.6 ; 44.231,33.6 ccw(c44.231,37.388) 46.909,34.71 C37.2@48.125,35.925
  Bottom Layer w0.8: U4.2@5.76,28.1 U4.1@7.03,28.1 C22.1@11.4,28.1 ; C22.1@11.4,28.25 C25.2@15.025,28.25 16.55,28.25 v2(16.575,28.275) 16.575,31.508 ccw(c11.283,31.508) 15.408,34.823 TP15.1@15.025,35.3 TP15.1@15.025,35.25 ; C37.2@48.125,35.925 C37.2@48.35,35.925 48.425,36 v1(49.725,36)
+5: C1.2 C2.2 C9.2 C29.2 C32.1 L4.2 P4.1 P5.1 U1.3 U2.5 U3.5 | length 120.7
  Top Layer w0.5: C32.1@13.2,18.425 14.842,20.067 cw(c17.092,17.819) 17.092,21 35.525,21 35.6,21 ; v1(35.6,19.4) 35.6,21 ; v1(48.175,19.3) 48.175,21.8 ; 70.066,21.359 67.789,23.636 67.786,23.639 ccw(c65.406,21.255) 65.406,24.624 63.415,24.624 ccw(c63.415,20.783) 60.698,23.498 59.683,22.483 cw(c58.036,24.127) 58.036,21.8 58.034,21.8 48.175,21.8 ; 70.068,21.357 cw(c68.302,19.59) 70.8,19.591 70.8,19.589 70.8,18.051 70.8,18.049 ccw(c75.335,18.049) 72.128,14.842 72.13,14.84 P5.1@76.55,10.42 ; 35.6,21 35.891,21.291 cw(c37.118,20.066) 37.118,21.8 37.12,21.8 48.175,21.8
  Top Layer w1: v2(10.025,18.925) 12.7,18.925 13.2,18.425 13.2,17.064 12.7,16.564 11.286,16.564 v1(10.875,16.975) ; v1(10.875,14.475) 10.875,13.325 11.875,12.325 L4.2@13.2,12.325
  Bottom Layer w0.5: C9.2@10.084,20.21 U1.3@12.265,20.21 ; v1(35.6,19.4) 36.3,18.7 36.675,18.7 C2.2@36.825,18.55 ; C2.2@36.838,18.563 38.687,18.563 U3.5@38.7,18.575 ; v1(48.175,19.3) 48.232,19.243 48.232,19.143 49.25,18.125 U2.5@51.2,18.125 ; P5.1@76.55,10.42 79.882,10.42 80.4,10.938 80.4,19.411 ccw(c77.844,19.411) 79.652,21.218 79.65,21.22 P4.1@76.55,24.32
  Bottom Layer w1: C9.2@10.025,20.15 C9.2@10.084,20.21 ; v2(10.025,18.925) C9.2@10.025,20.15 ; v1(10.875,14.475) C29.2@10.875,15.475 ; C29.2@10.875,15.65 v1(10.875,16.975)
+5V_ISO: C27.1 R20.2 R22.2 R23.2 U5.4 U6.8 U7.10 U7.16 | length 35.9
  Top Layer w0.5: v1(20.85,52.1) ccw(c23.566,54.816) 23.566,50.975 v1(23.975,50.975) 24.135,51.135 ccw(c20.659,54.611) 25.575,54.611 v1(25.575,58.675)
  Bottom Layer w0.5: R22.2@20.05,59.775 21.246,59.775 cw(c21.246,57.956) 22.532,59.243 22.534,59.241 22.651,59.124 22.773,59.002 ccw(c23.622,59.851) 23.621,58.65 23.9,58.65 R20.2@24.275,58.65 24.278,58.647 25.575,58.647 27.573,58.647 U7.16@27.575,58.645 ; v1(20.85,52.1) R23.2@19.575,52.1 19.615,52.14 19.615,53.145 20.5,54.03 21.225,54.03 U6.8@21.24,54.045 ; v1(23.975,50.975) 24,51 27.55,51 U7.10@27.575,51.025 ; R20.2@24.27,58.655 24.27,58.8 24.27,59.291 cw(c26.941,59.288) 25.054,61.179 26.725,62.85 C27.1@26.725,63.05 26.92,63.245 26.92,64.065 U5.4@28.38,65.525
+5V_OUT: C31.2 C33.1 L5.2 P2.1 R2.2 R25.2 R36.2 R68.2 U5.2 | length 166.1
  Top Layer w0.5: v1(19.675,19) 19.693,19.018 C33.1@22.475,19.018 ; v1(19.675,25.575) 19.675,29.917 19.675,29.919 cw(c20.897,29.919) 20.034,30.784 20.33,31.08 cw(c21.404,30.008) 21.404,31.525 21.405,31.525 22.059,31.525 22.061,31.525 ccw(c22.061,33.49) 23.452,32.102 24.036,32.686 ccw(c22.196,34.529) 24.8,34.529 24.8,37.697 24.8,37.698 cw(c27.759,37.698) 25.668,39.792 27.121,41.245 cw(c30.631,37.738) 30.631,42.7 30.633,42.7 38.271,42.7 38.273,42.7 ccw(c38.273,47.715) 41.82,44.17 48.083,50.433 ccw(c46.115,52.404) 48.9,52.404 48.9,54.32 48.9,54.321 cw(c51.564,54.321) 49.68,56.205 P2.1@50.825,57.35 ; C33.1@21.825,17.425 21.825,18.368 C33.1@22.475,19.018 ; v1(50.704,5.961) 50.673,5.931 34.706,5.931 34.65,5.875 33.409,5.875 33.407,5.875 cw(c33.407,9.419) 30.901,6.913 30.899,6.915 28.422,9.392 28.42,9.394 cw(c30.884,11.857) 27.4,11.857 27.4,11.859 27.4,13.895 ccw(c24.007,13.895) 26.407,16.293 26.404,16.296 24.363,18.337 24.36,18.34 ccw(c22.722,16.7) 22.722,19.018 22.575,19.018 C33.1@22.475,19.018
  Top Layer w1: v1(18.625,14.4) 18.625,13.3 19.625,12.3 L5.2@21.85,12.3 ; v1(20.025,16.95) 21.35,16.95 C33.1@21.825,17.425
  Bottom Layer w0.5: v1(19.675,19) v1(19.675,25.575) ; R68.2@33.4,7.7 33.55,7.55 33.55,7 v1(34.65,5.9) ; v1(50.704,5.961) 58.305,5.961 ccw(c58.31,8.377) 60.019,6.669 60.021,6.671 ccw(c58.74,7.952) 60.55,8.017 60.55,8.925 ; R36.2@61.675,9.108 61.9,9.108 R36.2@62.05,8.958 60.583,8.958 60.55,8.925 ; R2.2@61.975,15.816 60.566,15.816 60.55,15.8 ; R25.2@62.15,22.1 61.775,21.95 61.675,21.95 61.163,21.438 ccw(c62.642,19.959) 60.55,19.959 60.55,19.957 60.55,15.8 ; 60.55,8.925 60.55,15.8
  Bottom Layer w1: C31.2@18.6,15.7 18.6,16.364 19.186,16.95 v1(20.025,16.95) ; v1(18.625,14.4) C31.2@18.625,15.625 ; U5.2@33.46,65.525 33.46,65.926 cw(c35.837,65.926) 34.159,67.609 cw(c34.863,66.899) 34.206,67.653 34.696,68.08 cw(c35.86,66.289) 35.86,68.425 42.151,68.425 cw(c42.151,66.013) 43.857,67.718 43.858,67.717 45.242,66.333 45.245,66.33 cw(c42.576,63.662) 46.35,63.666 ccw(c50.785,63.662) 47.649,60.526 47.651,60.524 P2.1@50.825,57.35
+5VDC: C20.2 C23.1 C28.2 C30.2 L2.1 L4.1 L5.1 P6.16 | length 55.8
  Top Layer w1: v2(2.1,20.925) 2.125,20.925 4.575,18.475 4.575,15.975 4.575,15.568 ccw(c9.092,15.571) 5.898,12.377 5.9,12.375 10.95,7.325 L4.1@13.2,7.325 14.975,7.325 15.975,6.325 v1(15.975,4.725) ; v2(2.125,26.025) 2.177,26.077 2.177,30.777 L2.1@2.5,31.1 ; v1(20.225,2.7) 20.225,6.3 21.225,7.3 L5.1@21.85,7.3
  Bottom Layer w1: v2(2.1,20.925) 2.125,20.95 2.125,23.95 C20.2@2.15,23.975 ; v2(2.125,26.025) 2.137,26.013 C20.2@2.137,24.1 ; v1(15.975,4.725) C30.2@17.475,4.725 22.434,4.725 cw(c22.434,2.092) 24.295,3.955 24.298,3.952 P6.16@25.398,2.852 ; v1(20.225,2.7) 20.925,2.7 C28.2@21,2.775 ; C28.2@21.1,2.7 25.344,2.7 25.65,2.394 P6.16@25.898,2.394
GND_2: C27.2 J2.2 R29.1 R32.1 U5.3 U6.5 U7.9 U7.15 ZD1.1 ZD2.1 | length 17.3
  Bottom Layer w0.5: U6.5@21.24,57.855 22.72,57.855 22.975,57.6 25.475,57.6 25.7,57.375 U7.15@27.575,57.375
  Bottom Layer w1: ZD2.1@9.619,56 R29.1@12.175,56
  Bottom Layer w2: J2.2@4.675,57.426 ZD2.1@9.55,57.426 ; ZD2.1@9.55,55.931 ZD2.1@9.55,57.426 ; ZD1.1@9.55,59.269 ZD2.1@9.55,57.426
GND_III: C1.1 C2.1 C3.2 C4.2 C5.1 C7.1 C9.1 C12.1 C13.1 C14.1 C15.1 C16.1 C17.1 C20.1 C21.2 C22.2 C23.2 C24.2 C25.1 C26.1 C28.1 C29.1 C30.1 C31.1 C32.2 C33.2 C34.1 C35.1 C36.1 C37.1 C38.1 C39.2 C40.2 C41.1 C42.1 C43.1 C44.1 C45.1 C46.1 C47.1 C48.1 C49.1 D1.2 D2.2 D3.2 D4.2 D5.2 D6.2 D7.2 D8.2 D9.2 J1.6 P1.1 P2.4 P3.1 P4.5 P5.5 P6.7 R12.2 R13.2 R14.1 R15.1 R19.1 R31.1 R34.1 R50.1 R51.1 R63.1 R64.1 R65.1 R66.1 R67.1 R71.1 T1.2 T2.2 T3.2 T4.2 TP30.1 TP39.1 U1.1 U2.2 U3.2 U4.4 U5.1 U7.2 U7.8 U8.8 U8.23 U8.35 U8.47 VD1.1 VD2.1 | length 3.8
  Bottom Layer w0.5: U2.2@53.6,17.175 R14.1@57.4,17.175
  other v1: 16.076,15.7 5,30.825 60.55,32.375 52.425,33.275 58.65,34.725 46.125,38.213 63.073,40.191
NetC3_1: C3.1 C7.2 L1.1 U1.2 | length 35.9
  Top Layer w0.5: v1(15.425,18.275) 16.392,19.242 cw(c18.461,17.175) 18.461,20.1 23.52,20.1 cw(c23.52,17.311) 25.492,19.283 25.494,19.281 27.194,17.581 27.196,17.579 ccw(c29.016,19.398) 29.013,16.825 29.65,16.825 C3.1@30.4,17.5
  Top Layer w0.8: v2(29.175,19.55) 29.265,19.46 29.44,19.46 30.4,18.5 C3.1@30.4,17.5 ; L1.1@31.299,29.375 31.749,27.951 v2(33.025,26.675)
  Bottom Layer w0.5: 13.825,20.604 13.825,18.8 14.35,18.275 v1(15.425,18.275)
  Bottom Layer w0.8: v2(29.175,19.55) 29.673,19.55 ccw(c29.671,21.128) 30.787,20.012 32.349,21.574 ccw(c30.9,23.024) 32.95,23.024 32.95,23.375 32.95,24.025 33.075,24.15 32.975,24.25 32.975,26.625 v2(33.025,26.675)
NetC6_1: C6.1 C18.1 R9.2 R16.1 TP11.1 U2.4 | length 13.3
  Top Layer w0.5: v1(51.35,15.475) 51.35,19.225 v1(51.55,20.325)
  Bottom Layer w0.5: U2.4@51.2,16.225 51.218,16.225 51.293,16.15 51.293,15.532 v1(51.35,15.475) C6.1@51.35,14.55 51.363,14.537 51.363,13.013 R9.2@51.375,13 ; v1(51.55,20.325) 51.575,20.35 51.575,21.325 C18.1@51.6,21.35 51.575,21.375 R16.1@51.575,23.2 51.575,25.425 TP11.1@51.55,25.45
NetC6_2: C6.2 C16.2 R3.2 R14.2 TP3.1 U2.3 | length 9.2
  Bottom Layer w0.5: R3.2@53.375,13 53.363,13.012 53.363,14.537 C6.2@53.35,14.55 53.35,14.775 53.6,15.025 53.6,15.312 ; U2.3@53.6,16.225 53.6,15.312 ; R14.2@57.4,15.175 C16.2@55.55,15.175 53.737,15.175 53.6,15.312 ; TP3.1@57.425,13.125 R14.2@57.425,15.15
NetC8_1: C8.1 C19.1 R10.2 R17.1 TP13.1 U3.4 | length 13.4
  Top Layer w0.5: v1(38.95,15.85) 38.95,19.45 v1(39.1,20.7)
  Bottom Layer w0.5: U3.4@38.7,16.675 38.818,16.675 38.893,16.6 38.893,15.907 v1(38.95,15.85) 38.95,14.825 39,14.775 39,13.25 R10.2@39.05,13.2 ; v1(39.1,20.7) 39.087,20.713 39.087,21.737 C19.1@39.075,21.75 39.087,21.762 39.087,23.5 39.087,25.488 TP13.1@39.1,25.5